# Altium PCB Secondary-PCB.PcbDoc (part 2 of 2)
Units mil, origin at the board's own origin, x right, y up, seen from the top; angles counter-clockwise.
Board outline 1653.54 x 3188.98 mil, 2 copper layers (Top Layer, Bottom Layer), stack 57 mil thick; 59 components, 38 nets, 219 pads, 81 vias.
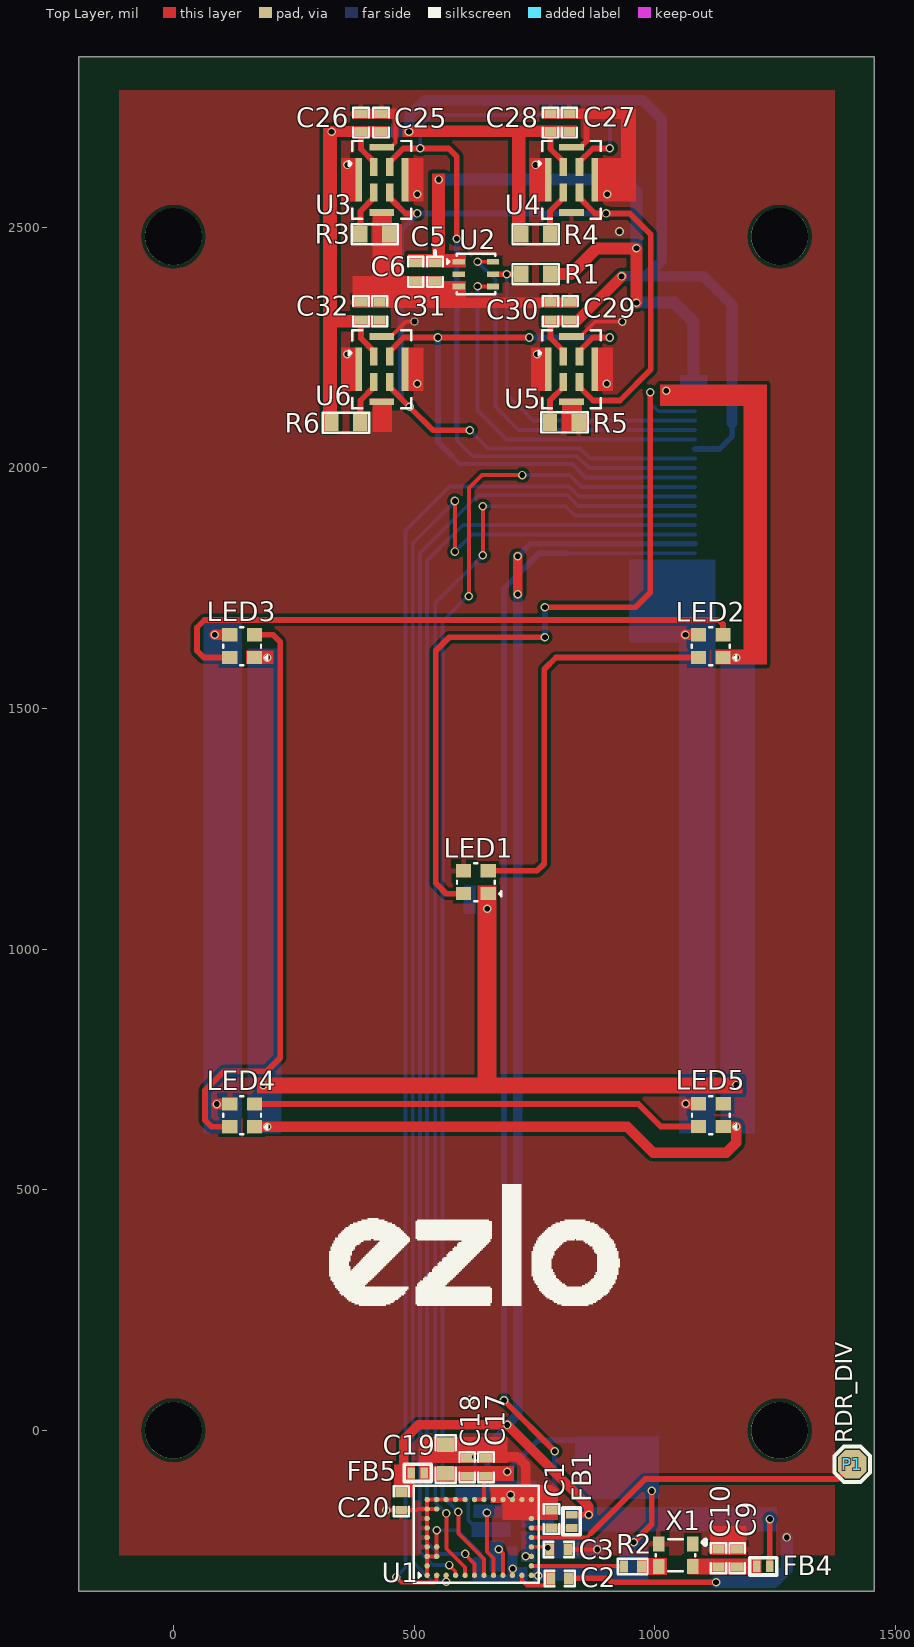
[diagram p0: Top Layer view]

## Other copper (continued)
Bottom Layer: (continued)
  rectangle net GND: 694.62,-313.63 715,-241.63
  rectangle net GND: 830.62,-266.63 893.62,-223
  rectangle net 1V8_SENSOR: 586,-143.63 658.43,-119.63
  region net 1V8_SENSOR: 700,-190.63 619.62,-190.63 619.62,-221.57 700,-221.57
  rectangle net VDD_A: 656.62,-293.63 685.62,-228.63
  rectangle net 3V3_SENSOR: 723,-201.63 752.62,-146.63
  rectangle net VDD_LF: 722.62,-273.63 752.62,-210.63
  rectangle net VDD_PLL: 764.62,-266.63 810.75,-222.63
  rectangle net VDD_PLL: 764.62,-266.63 791.62,-182.63
  rectangle net VDD_D: 623.62,-182.63 699.62,-154.63

## Silkscreen, mask and mechanical layers (free items; w line width, h text height)
Top Overlay:
  drawing of 311 lines, arcs and shapes, not listed
  text "RDR_DIV" at 1422.41,-27 h60 r90
Bottom Overlay:
  drawing of 3070 lines, arcs and shapes, not listed
  text "ZERO CARBON FOOTPRINT" at 1030,147 h45
Dimension:
  lines w0.5: 374.02,2126.52 374.02,2284 ; 374.02,2126.52 492.13,2126.52 ; 374.02,2126.52 492.13,2126.52 ; 374.02,2126.52 374.02,2284 ; 374.02,2126.52 492.13,2126.52 ; 374.02,2126.52 374.02,2284 ; 374.02,2284 492.13,2284 ; 374.02,2284 492.13,2284 ; 374.02,2284 492.13,2284 ; 374.02,2520.22 374.02,2677.7 ; 374.02,2520.22 492.13,2520.22 ; 374.02,2520.22 492.13,2520.22 ; 374.02,2520.22 374.02,2677.7 ; 374.02,2520.22 492.13,2520.22 ; 374.02,2520.22 374.02,2677.7 ; 374.02,2677.7 492.13,2677.7 ; 374.02,2677.7 492.13,2677.7 ; 374.02,2677.7 492.13,2677.7 ; 492.13,2126.52 492.13,2284 ; 492.13,2126.52 492.13,2284 ; 492.13,2126.52 492.13,2284 ; 492.13,2520.22 492.13,2677.7 ; 492.13,2520.22 492.13,2677.7 ; 492.13,2520.22 492.13,2677.7 ; 767.72,2126.52 885.83,2126.52 ; 767.72,2126.52 767.72,2284 ; 767.72,2126.52 885.83,2126.52 ; 767.72,2126.52 767.72,2284 ; 767.72,2126.52 885.83,2126.52 ; 767.72,2126.52 767.72,2284 ; 767.72,2284 885.83,2284 ; 767.72,2284 885.83,2284 ; 767.72,2284 885.83,2284 ; 767.72,2520.22 767.72,2677.7 ; 767.72,2520.22 885.83,2520.22 ; 767.72,2520.22 885.83,2520.22 ; 767.72,2520.22 767.72,2677.7 ; 767.72,2520.22 885.83,2520.22 ; 767.72,2520.22 767.72,2677.7 ; 767.72,2677.7 885.83,2677.7 ; 767.72,2677.7 885.83,2677.7 ; 767.72,2677.7 885.83,2677.7 ; 885.83,2126.52 885.83,2284 ; 885.83,2126.52 885.83,2284 ; 885.83,2126.52 885.83,2284 ; 885.83,2520.22 885.83,2677.7 ; 885.83,2520.22 885.83,2677.7 ; 885.83,2520.22 885.83,2677.7
Board_outline:
  the board outline again, w10
Fabrication layer:
  drawing of 191 lines, arcs and shapes, not listed
  text "Layer" at 1978.58,2843 h60
  text "Name" at 2388.49,2843 h60
  text "Material" at 3318.23,2843 h60
  text "Thickness" at 4178,2843 h60
  text "Constant" at 4827.84,2843 h60
  text "Board Layer Stack" at 5397.7,2843 h60
  text "Top Overlay" at 2388.49,2723 h60
  text "Top Solder" at 2388.49,2603 h60
  text "Solder Resist" at 3318.23,2603 h60
  text "3.00mil" at 4178,2603 h60
  text "3.5" at 4827.84,2603 h60
  text "1" at 1978.58,2483 h60
  text "Top Layer" at 2388.49,2483 h60
  text "10.00mil" at 4178,2483 h60
  text "Dielectric 1" at 2388.49,2363 h60
  text "FR-4" at 3318.23,2363 h60
  text "37.00mil" at 4178,2363 h60
  text "4.8" at 4827.84,2363 h60
  text "2" at 1978.58,2243 h60
  text "Bottom Layer" at 2388.49,2243 h60
  text "10.00mil" at 4178,2243 h60
  text "Bottom Solder" at 2388.49,2123 h60
  text "Solder Resist" at 3318.23,2123 h60
  text "3.00mil" at 4178,2123 h60
  text "3.5" at 4827.84,2123 h60
  text "Bottom Overlay" at 2388.49,2003 h60
  text "Total board thickness:" at 1978.58,1883 h60
  text "63.00mil" at 4178,1883 h60
Drill Drawing:
  circle w10: c-96.38,3319.83 r33.33
  lines w10: -129.71,3436.5 -63.04,3436.5 -63.04,3503.17 -129.71,3503.17 -129.71,3436.5
  lines w15: -189.5,3241.5 6790.61,3241.5 ; -189.5,3541.5 6790.61,3541.5 ; 361.38,3091.5 361.38,3691.5 ; 901.24,3091.5 901.24,3691.5 ; 2020.91,3091.5 2020.91,3691.5 ; 2526.79,3091.5 2526.79,3691.5 ; 3260.59,3091.5 3260.59,3691.5 ; 4760.14,3091.5 4760.14,3691.5 ; 5349.99,3091.5 5349.99,3691.5 ; 6095.78,3091.5 6095.78,3691.5 ; -189.5,3091.5 6790.61,3091.5 6790.61,3691.5 -189.5,3691.5 -189.5,3091.5
  text "Symbol" at -99.5,3586.5 h72
  text "Count" at 406.38,3586.5 h72
  text "Hole Size" at 946.24,3586.5 h72
  text "Plated" at 2065.91,3586.5 h72
  text "Hole Type" at 2571.79,3586.5 h72
  text "Drill Layer Pair" at 3305.59,3586.5 h72
  text "Via/Pad" at 4805.14,3586.5 h72
  text "Pad Shape" at 5394.99,3586.5 h72
  text "Template" at 6140.78,3586.5 h72
  text "81" at 406.38,3436.5 h60
  text "0.300mm (11.81mil)" at 946.24,3436.5 h60
  text "PTH" at 2065.91,3436.5 h60
  text "Round" at 2571.79,3436.5 h60
  text "Top Layer - Bottom Layer" at 3305.59,3436.5 h60
  text "Via" at 4805.14,3436.5 h60
  text "Rounded" at 5394.99,3436.5 h60
  text "(Mixed)" at 6140.78,3436.5 h60
  text "4" at 406.38,3286.5 h60
  text "3.000mm (118.11mil)" at 946.24,3286.5 h60
  text "PTH" at 2065.91,3286.5 h60
  text "Round" at 2571.79,3286.5 h60
  text "Top Layer - Bottom Layer" at 3305.59,3286.5 h60
  text "Pad" at 4805.14,3286.5 h60
  text "Rounded" at 5394.99,3286.5 h60
  text "c300h300" at 6140.78,3286.5 h60
  text "85 Total" at 406.38,3136.5 h60

## Dimensions
-196.85,2854.33 to -196.85,-334.65 on Dimension
-196.85,2854.33 to 1456.69,2854.33 on Dimension

## Text inside footprints (layer, text, board x,y; h text height)
J1: Bottom Overlay "1" at 1013.99,1777.57 h30 r270; Bottom Overlay "Board Edge" at 904.85,1813 h30 r270